# Altium PCB PCB1.PcbDoc
Units mil, origin at the board's own origin, x right, y up, seen from the top; angles counter-clockwise.
Board outline 6000 x 4000 mil, 2 copper layers (Top Layer, Bottom Layer); 21 components, 11 nets, 55 pads, 6 vias.
Unrouted connection lines stored in the file: 5.
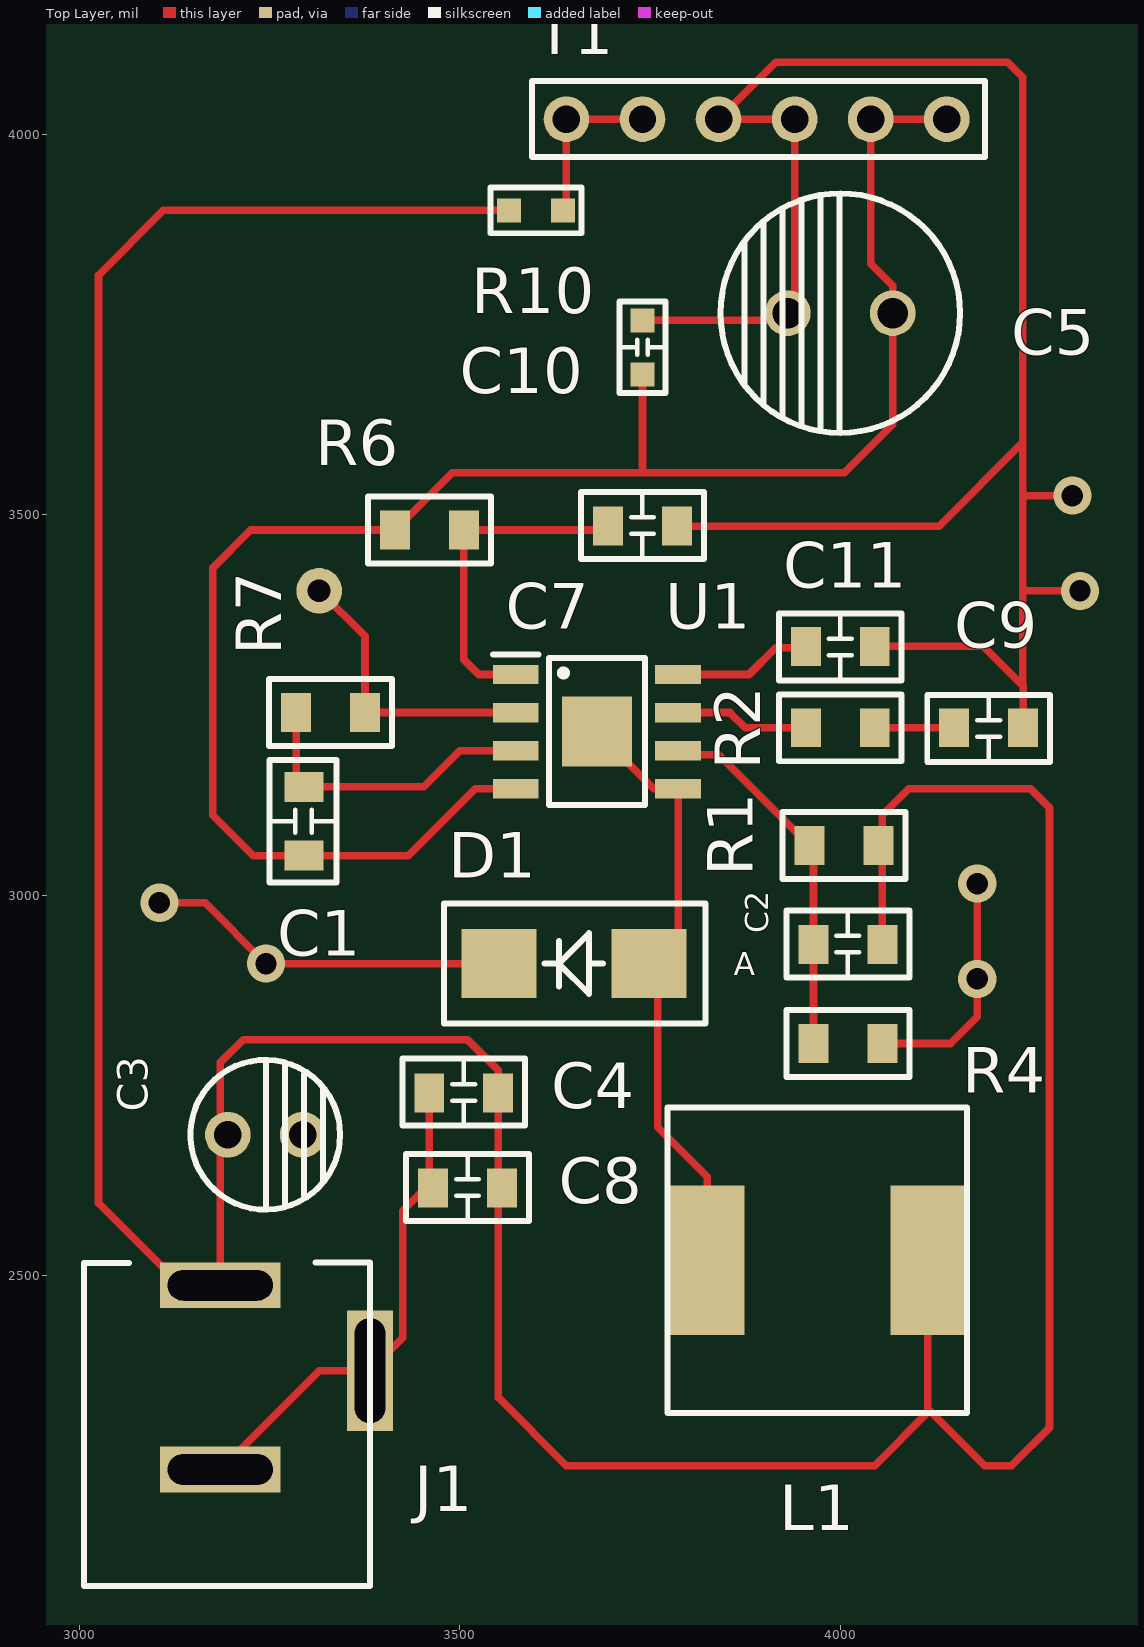
[diagram p0: Top Layer view]
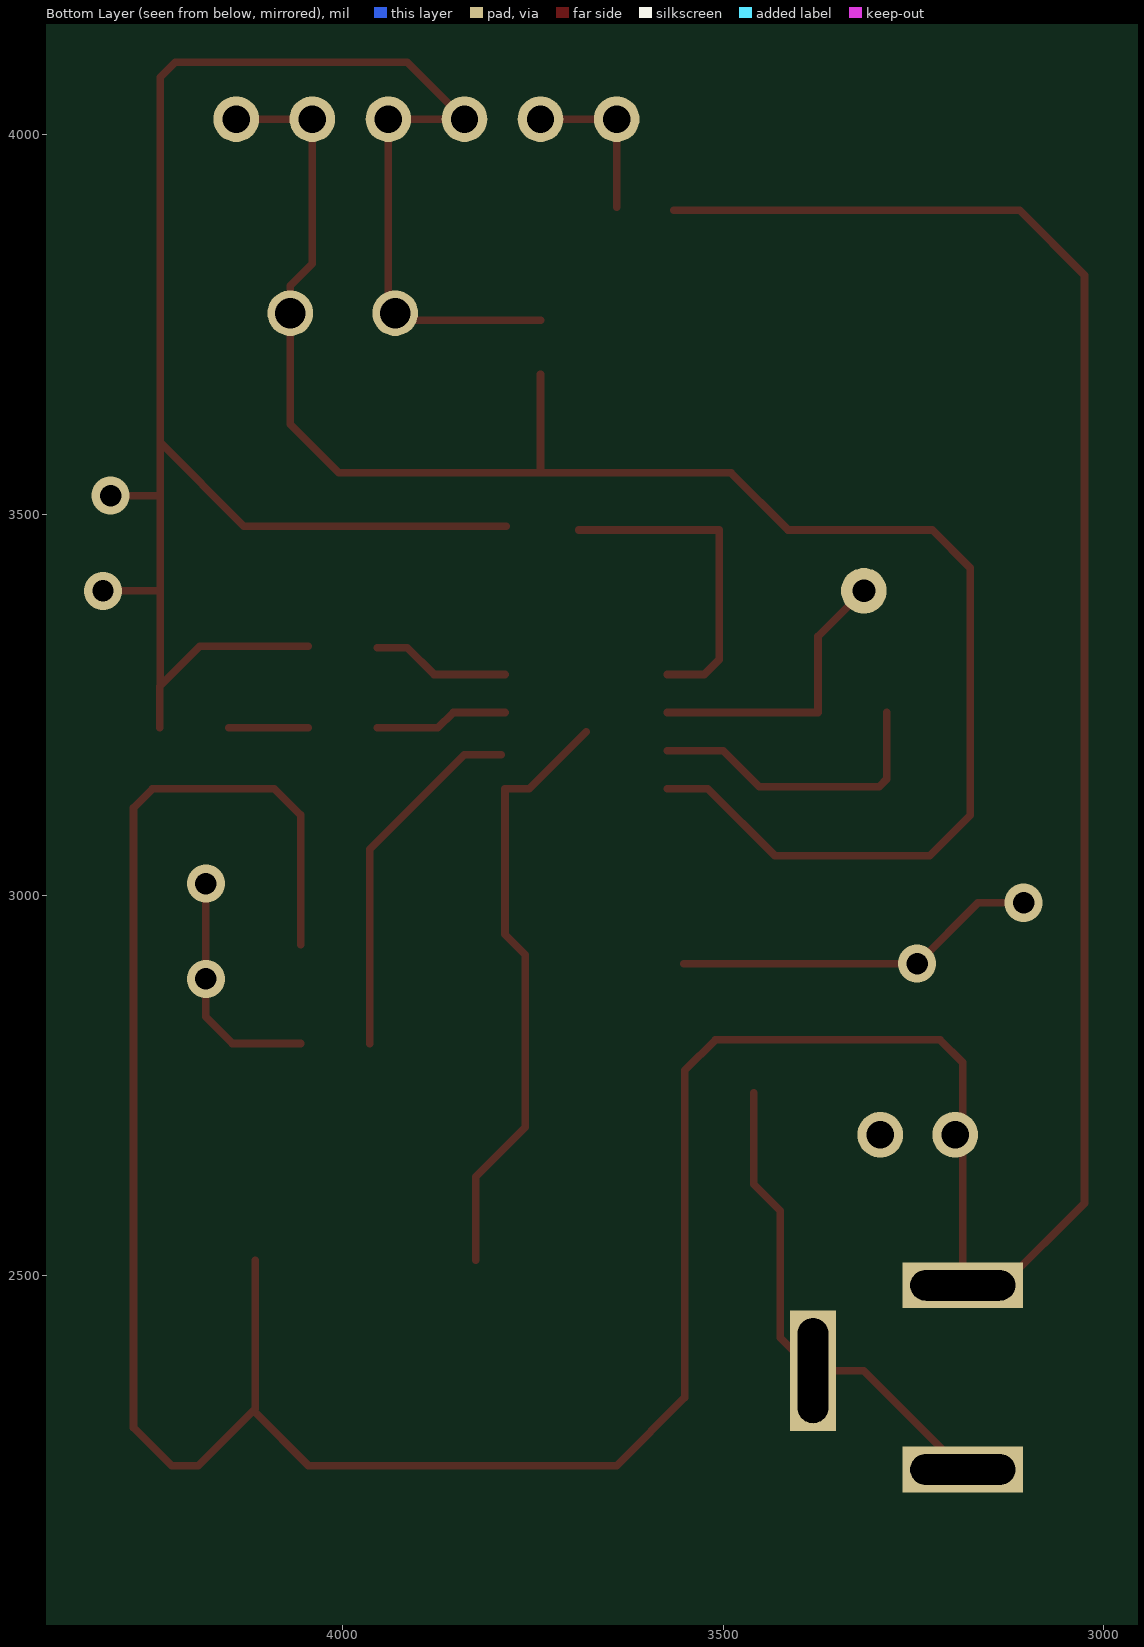
[diagram p1: Bottom Layer view, seen from below]
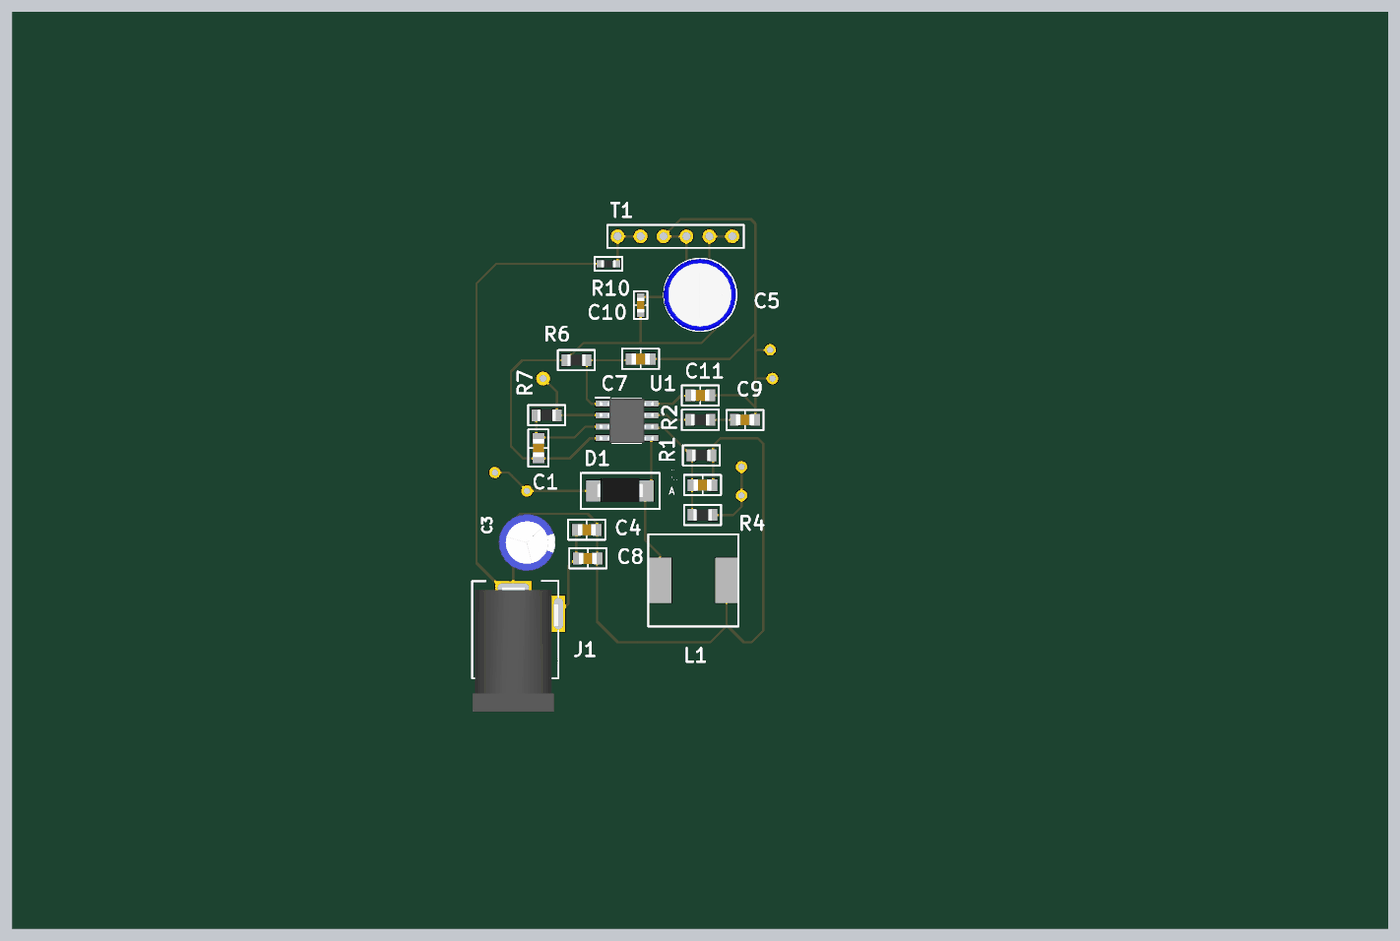
[diagram p2: 3D render of the assembled board from above, using the file's embedded part models]

## Layer stack, top to bottom
Top Solder: solder mask 0.4, Solder Resist, Dk 3.5
Top Layer: signal copper 1.4
Dielectric 1: dielectric 12.6, FR-4, Dk 4.8
Bottom Layer: signal copper 1.4
Bottom Solder: solder mask 0.4, Solder Resist, Dk 3.5

## Board outline
1000,1000 7000,1000 7000,5000 1000,5000

## Design rules (kind name [scope] priority, off if disabled: settings)
Clearance [All] p1: gap=10
PolygonConnect [All] p1: connectstyle=Relief reliefconductorwidth=10 reliefentries=4 polygonreliefangle="90 Angle" airgapwidth=10
RoutingVias [All] p1: holewidth=28 width=50 viastyle="Through Hole" minholewidth=28 minwidth=50 maxholewidth=28 maxwidth=50
SolderMaskExpansion [All] p1: expansion=4
Width [All] p1: maxlimit=10 minlimit=10 preferedwidth=10
30 further rules are at their usual default settings.

## Components (designator, comment, footprint, x,y, rotation, side; value= is the part's Value field where it differs from the comment)
C1 "1UF/100V" C_0805 3295,3097.1 r270 top
C2 "47pf/25v" C_0805 4010,2935 r180 top
C3 "47pf/100v" "CAP_ALLU 2.5mm" 3195,2685 r0 top
C4 "0.1uf/100v" C_0805 3505,2740 r180 top
C5 "47 uf/100v" "CAP_ALLU 3.5mm" 4000,3765 r180 top
C7 "0.1uf/100v" C_0805 3740,3485 r180 top
C8 "1.0uf/100v" C_0805 3510,2615 r180 top
C9 "47pf/25v" C_0805 4195,3220 r0 top
C10 "0.1 uf/100v" C_0603 3740,3720 r90 top
C11 "0.1uf/100v" C_0805 4000,3326.91 r0 top
D1 "DIODE" Diode_SMB 3650,2910 r180 top
J1 "CONN JACK PWR" "DC Power Socket" 3185,2245 r270 top
L1 "INDUCTOR IRON/SM" Inductor 3970,2520 r0 top
R1 "22k" R_0805 4005,3065 r180 top
R2 "2.2K" R_0805 4000,3220 r0 top
R4 "2K" R_0805 4010,2805 r0 top
R6 "100k" R_0805 3460,3480 r0 top
R7 "0R" R_0805 3330,3240 r0 top
R10 "0" R_0603 3600,3900 r0 top
T1 "1X3PIN" HDR1X6_2.54mm 4140,4020 r180 top
U1 "AX3162" SO8E 3680,3215 r0 top

## Footprints (in the part's own frame and the unit in brackets; to place one, negate y for a bottom-side part, rotate by r counter-clockwise, add the part's x,y. Pads: shape width x height; smd on the part's side, far side on the other; paste and mask are expansions set on the pad)
C_0603 [mm]
  rect 0.8x0.8 smd: 1(-0.9,0) 2(0.9,0)
  silkscreen extent -1.52,-0.76 1.52,0.76, body extent -0.8,-0.4 0.8,0.4, height 0.9
C_0805 [mm] "CAP SMD 0805"
  rect 1x1.3 smd: 1(-1.15,0) 2(1.15,0)
  silkscreen extent -2.05,-1.14 2.05,1.09, body extent -1,-0.62 1,0.63, height 1
"CAP_ALLU 2.5mm" [mil]
  round 60 hole 36: 1(0,0) 2(98.43,0)
  silkscreen extent -49,-98 148,98, body extent -74,-124 174,124, height 504
"CAP_ALLU 3.5mm" [mil]
  round 60 hole 40: 1(-68.9,0) 2(68.9,0)
  silkscreen extent -157,-157 157,157, body extent -157,-158 160,158, height 473
"DC Power Socket" [mil]
  rect 60x158 hole 40 slot 137.8 at 90 deg: 1(-242.13,0) 2(0,0)
  rect 158x60 hole 40 slot 137.8 at 0 deg: 3(-129.92,196.85)
  silkscreen extent -272,-179 153,197, body extent -246,-177 298,197, height 433
Diode_SMB [mm]
  rect 2.5x2.3 smd: 1(-2.5,0) 2(2.5,0)
  silkscreen extent -4.39,-2 4.34,2, body extent -2.62,-1.36 2.57,1.24, height 2.18
HDR1X6_2.54mm [mil] "Connector; Header; 6 Position"
  round 60 hole 36: 1(0,0) 2(100,0) 3(200,0) 4(300,0) 5(400,0) 6(500,0)
  silkscreen extent -50,-50 545,50
Inductor [mm] "Inductor 10.20 x 10"
  rect 2.5x5 smd: 1(-3.683,0) 2(3.683,0)
  silkscreen extent -5,-5.1 5,5.1, body extent -4.83,-4.95 4.83,4.95, height 5.1
R_0603 [mm] "RES SMD 0603"
  rect 0.8x0.8 smd: 1(-0.9,0) 2(0.9,0)
  silkscreen extent -1.52,-0.76 1.52,0.76, body extent -0.8,-0.4 0.8,0.4, height 0.4
R_0805 [mm] "RES SMD 0805"
  rect 1x1.3 smd: 1(-1.15,0) 2(1.15,0)
  silkscreen extent -2.05,-1.12 2.05,1.12, body extent -1,-0.62 1,0.63, height 0.5
SO8E [mm]
  rect 1.525x0.65 smd: 1(-2.712,1.905) 2(-2.712,0.635) 3(-2.712,-0.635) 4(-2.712,-1.905) 5(2.712,-1.905) 6(2.712,-0.635) 7(2.712,0.635) 8(2.712,1.905)
  rect 2.34x2.34 smd: 9(0,0)
  silkscreen extent -3.47,-2.45 1.6,2.58, body extent -3,-2.45 3,2.45, height 1.75

## Part data
C1 C2 C4 C7 C8 C9 C10 C11: library part C0603
C3 C5: library part CAP
R1 R2 R4 R6 R7 R10: library part RESISTOR

## Free pads (board coordinates)
  round 60 hole 30: 16(3315,3400)

## Via types
v1: diameter 50, hole 28, Top Layer to Bottom Layer, 6 vias

## Nets (pads, with @x,y where several pads share a name; then routed paths per layer and width w, separated by ;. In a path a pad name is that pad's centre, name@x,y a point inside that pad or via, vN(x,y) a via of type N, cw(c..) or ccw(c..) an arc to the next point about the centre after c; other vN are vias at no path point)
12V: C2.1 C3.1 C4.1 C8.1 J1.1 L1.2 R1.1 R10.1 | length 5384.1
  Top Layer w10: R10.1 3110,3900 3025,3815 3025,2595 3132.87,2487.13 J1.1 3185,2780 3215,2810 3510,2810 3550.28,2769.72 C4.1 3550.28,2339.72 3640,2250 4045,2250 4115,2320 ; C2.1 4055.28,3105.28 4090,3140 4250,3140 4275,3115 4275,2300 4225,2250 4190,2250 4115,2325 L1.2
GND: C3.2 C4.2 C5.2 C7.1 C8.2 C9.2 C10.2 C11.2 D1.2 J1.2 J1.3 pad.16 R4.2 R7.2 T1.3 T1.4 U1.2 | length 4529.7
  Top Layer w10: v1(3105,2990) 3165,2990 v1(3245,2910) D1.2 ; J1.2 3314.92,2374.92 J1.3 3425,2418.07 3425,2585.28 3459.72,2620 C4.2 ; pad.16 3375.28,3340.28 R7.2 U1.2 ; C10.2 3921.54,3755.43 C5.2 3940,3773.9 T1.3 T1.4 3915,4095 4220,4095 4240,4075 4240,3595 ; C7.1 4130,3485 4240,3595 ; C11.2 4188.09,3326.91 4240,3275 ; R4.2 4145,2805 4180,2840 v1(4180,3015) ; C9.2 4240.28,3274.72 4240,3275 ; v1(4305,3525) 4240,3525 ; v1(4315,3400) 4240,3400 ; 4240,3275 4240,3400 ; 4240,3400 4240,3525 ; 4240,3525 4240,3595
  other v1: 4180,2890
NetC1_1: C1.1 R7.1 U1.3 | length 399.8
  Top Layer w10: R7.1 3284.72,3152.65 C1.1 3452.38,3142.38 3500,3190 U1.3
NetC2_2: C2.2 R1.2 R4.1 U1.6 | length 479.3
  Top Layer w10: U1.6@3792.05,3184.72 3840,3184.72 R1.2 3964.72,3060 C2.2 R4.1
NetC7_2: C7.2 R6.2 U1.1 | length 430.8
  Top Layer w10: U1.1 3525,3290 3505.28,3309.72 R6.2 C7.2@3689.72,3480
NetC9_1: C9.1 R2.2 | length 104.4
  Top Layer w10: R2.2 C9.1
NetC11_1: C11.1 U1.8 | length 182.5
  Top Layer w10: U1.8 3880,3290 3915,3325 C11.1@3954.72,3325
NetD1_1: D1.1 L1.1 U1.5 U1.9 | length 795.9
  Top Layer w10: U1.9 3755,3140 U1.5 3786.77,2948.35 3760,2921.57 3760,2695 3825,2630 L1.1
NetR2_1: R2.1 U1.7 | length 176.2
  Top Layer w10: U1.7 3855,3240 3875,3220 R2.1
NetR10_2: R10.2 T1.5 T1.6 | length 215.4
  Top Layer w10: R10.2@3640,3904.57 T1.6 T1.5
VIN: C1.2 C5.1 C10.1 R6.1 T1.1 T1.2 U1.4 | length 2396.6
  Top Layer w10: U1.4 3520,3140 3431.82,3051.82 C1.2 3228.18,3051.82 3175,3105 3175,3430 3225,3480 R6.1 3489.72,3555 3740,3555 ; C10.1 3740,3555 ; T1.1 T1.2 4040,3830 4068.9,3801.1 C5.1 4068.9,3618.9 4005,3555 3740,3555

## Text inside footprints (layer, text, board x,y; h text height)
D1: Top Overlay "A" at 3860,2895 h30